# Altium PCB PCB1.PcbDoc (part 2 of 2)
Units mil, origin at the board's own origin, x right, y up, seen from the top; angles counter-clockwise.
Board outline 2130 x 2330 mil, 2 copper layers (Top Layer, Bottom Layer); 110 components, 79 nets, 324 pads, 362 vias.
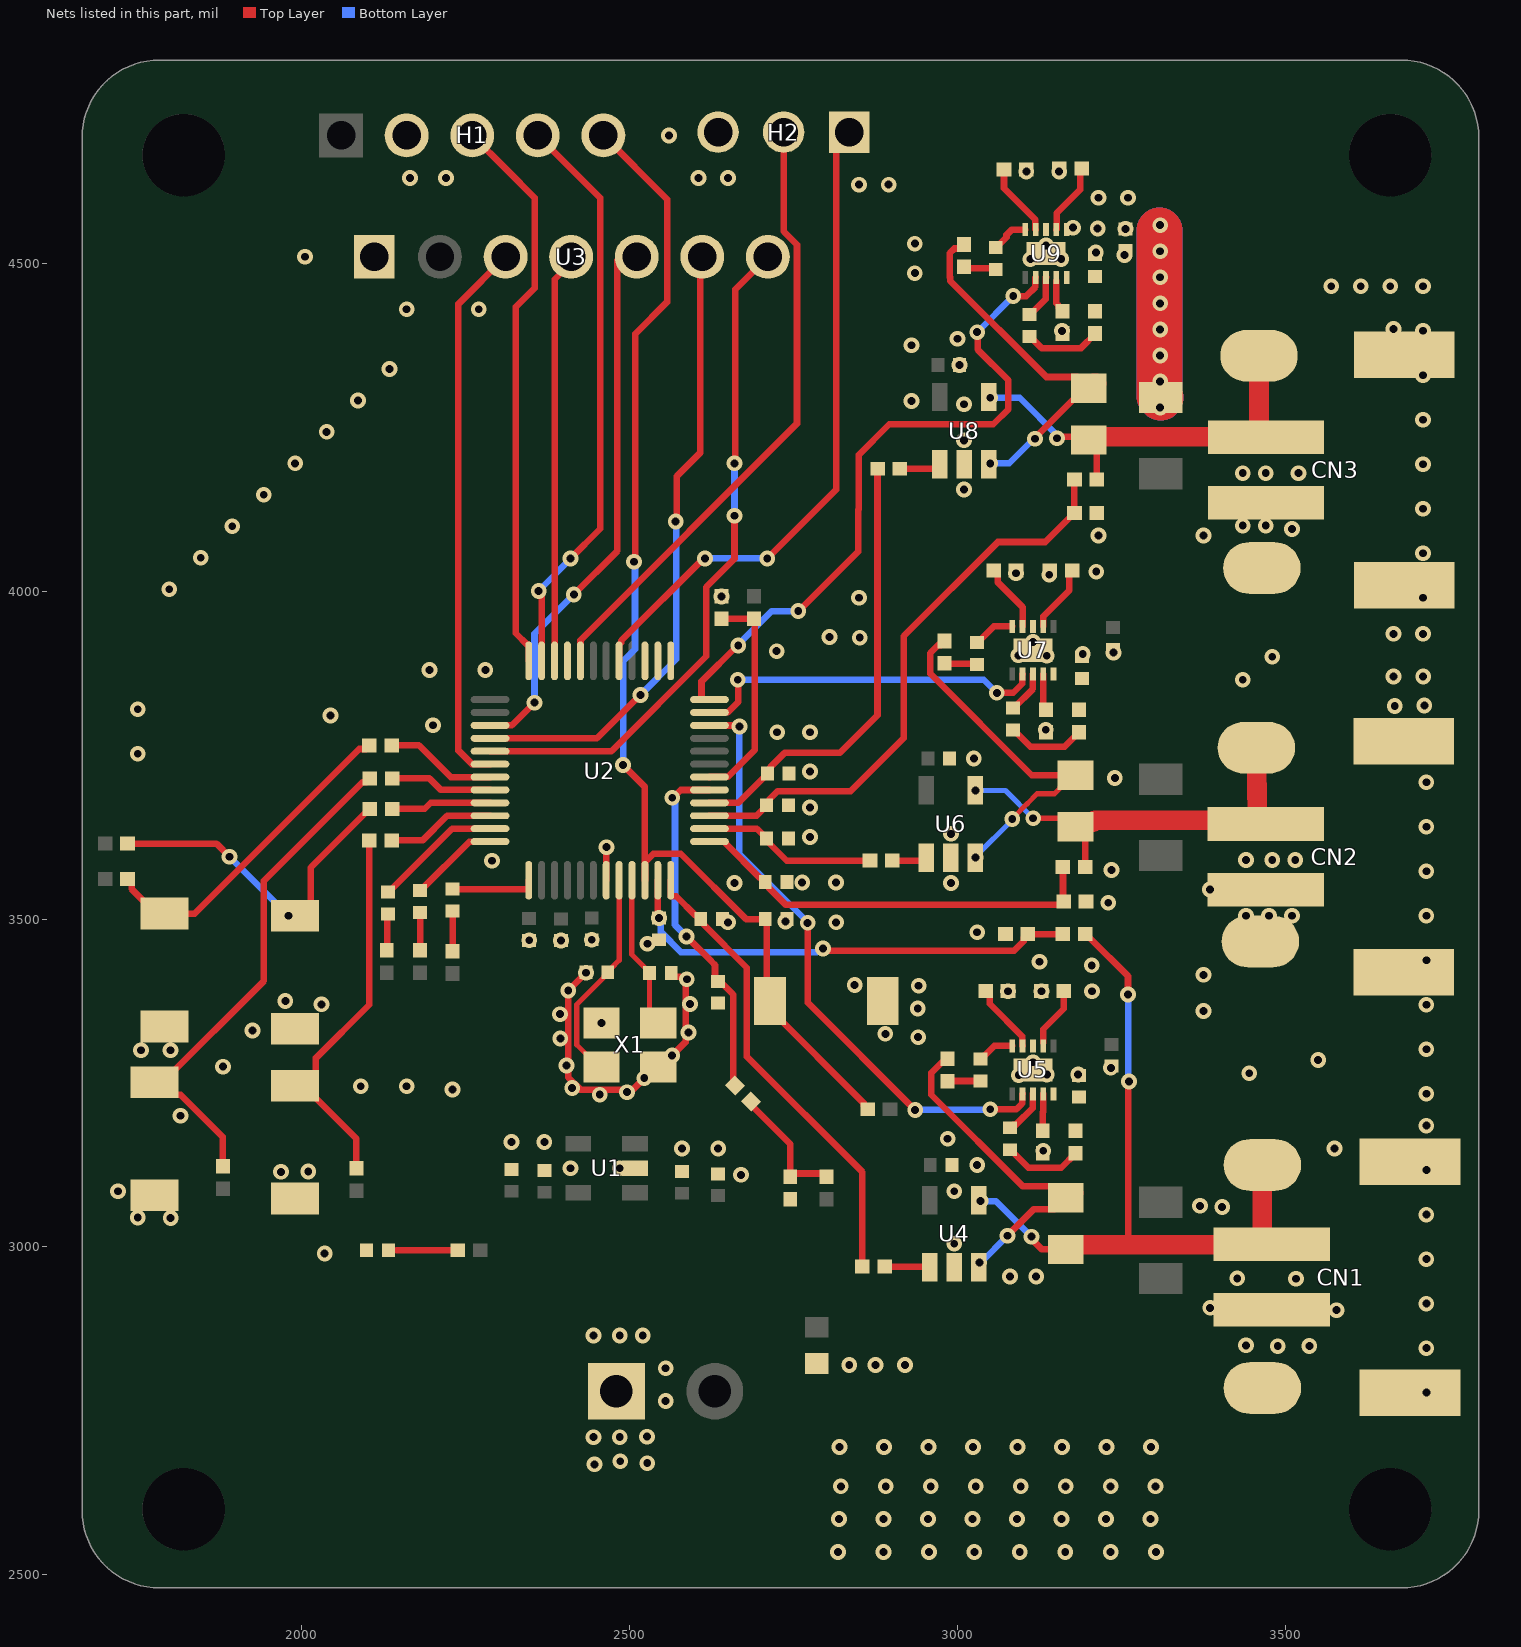
[diagram p2: the nets of this part, all layers, seen from the top]

## Via types
v1: diameter 24, hole 12, Top Layer to Bottom Layer, tented both sides, 362 vias

## Nets (pads, with @x,y where several pads share a name; then routed paths per layer and width w, separated by ;. In a path a pad name is that pad's centre, name@x,y a point inside that pad or via, vN(x,y) a via of type N, cw(c..) or ccw(c..) an arc to the next point about the centre after c; other vN are vias at no path point) (continued)
5V_3: C25.2 R41.1 U9.1 | length 510.5
  Top Layer w70: v1@3308.28,4550.18 3308.28,4513.15 3308.28,4438.95 3308.28,4399.21 3308.28,4359.47 3308.28,4297.34 R41.1@3310,4295.62
  Bottom Layer w70: v1@3308.28,4550.18 3308.28,4513.15 3308.28,4297.34 3310,4295.62
  other v1: 3309.09,4280 3309.09,4319.74 3309.09,4359.47 3309.09,4399.21 3309.09,4438.95 3309.09,4478.69 3309.09,4518.42 3213.76,4553.23 3256.34,4552.54 3176.23,4554.41 3309.09,4558.16 3215,4600 3260,4600
ADC1_IN0: C14.1 R8.2 R13.1 U2.11 | length 723.5
  Top Layer w10: U2.11@2543.08,3559.14 2543.07,3503.47 v1(2545,3501.54) ; v1(2795,3455) 2798.79,3455 2802.03,3451.76 3086.38,3451.76 3101.22,3466.61 3101.22,3471.52 3106.85,3477.15 R8.2@3160.51,3477.15
  Bottom Layer w10: v1(2545,3501.54) 2547.68,3498.86 2547.68,3480.15 2578.39,3449.45 2785.66,3449.45 2791.21,3455 v1(2795,3455)
ADC1_IN1: C15.1 R9.2 U2.12 | length 716.1
  Top Layer w10: U2.12@2562.77,3559.14 2562.77,3535.1 2563.06,3534.81 2571.23,3534.81 2600.41,3505.63 2603.62,3505.63 2608.46,3500.79 C15.1@2608.46,3500 ; C15.1@2608.46,3499.21 2613.3,3494.37 2613.3,3491.29 2678.77,3425.82 2678.77,3290.38 2855,3114.15 R9.2@2855,2970
ADC1_IN2: C21.1 R32.2 R34.1 U2.13 | length 637.8
  Top Layer w10: U2.13@2621.82,3618.19 2645.86,3618.19 2646.15,3617.9 2646.15,3615.56 2699.75,3561.96 2701.98,3561.96 2706.82,3557.12 C21.1@2706.82,3556.33 2711.66,3551.49 2711.66,3548.32 2738.35,3521.63 3156.69,3521.63 R34.1@3161.89,3526.83 ; R34.1@3160.93,3526.83 R32.2@3160.93,3578.69
ADC1_IN3: C22.1 R33.2 U2.14 | length 266.9
  Top Layer w10: U2.14@2621.82,3637.88 2694.09,3637.88 2703.52,3628.45 2704.11,3628.45 2708.95,3623.61 C22.1@2708.95,3623.02 ; C22.1@2708.95,3622.82 2713.79,3617.98 2713.79,3615.03 2739.71,3589.12 R33.2@2866.55,3589.12
ADC1_IN4: C24.1 R40.2 R44.1 U2.15 | length 893.4
  Top Layer w10: U2.15@2621.82,3657.56 2693.67,3657.56 2708.95,3672.84 2708.95,3674.42 2713.79,3679.26 2713.79,3683.1 2725.95,3695.26 2837.37,3695.26 2918.07,3775.96 2918.07,3931.48 3061.59,4075 3133.85,4075 3177.87,4119.02 R44.1@3178.37,4119.02 R40.2@3178.37,4170.41
ADC1_IN5: C27.1 R43.2 U2.16 | length 690.6
  Top Layer w10: U2.16@2621.82,3677.25 2621.94,3677.37 2665.96,3677.37 2710.04,3721.44 2710.04,3723.02 2714.88,3727.86 2714.88,3731.85 2736.42,3753.38 2820.6,3753.38 2878.03,3810.82 R43.2@2878.03,4186.63
ADC1_IN6: C12.2 R4.2 U2.17 | length 542.1
  Top Layer w10: v1(2565,3685) 2565.98,3685 2577.86,3696.88 U2.17@2621.82,3696.93 ; v1(2586.82,3473.54) 2625.2,3435.16 2625.2,3434.84 2630.2,3429.84 2630.2,3409.8 2639.84,3400.16 2642.79,3400.16 2658.03,3384.92 2658.03,3256.79 2660.47,3254.35 2660.47,3246.39 R4.2@2660.83,3246.03
  Bottom Layer w10: v1(2565,3685) 2565,3681.21 2569.25,3676.96 2569.25,3491.11 v1(2586.82,3473.54)
ADC1_IN7: R2.2 R5.2 U2.18 | length 336.7
  Top Layer w10: U2.18@2621.82,3716.62 2621.94,3716.74 2649.54,3716.74 2691.17,3758.37 2691.17,3956.79 R2.2@2690,3957.96 R5.2@2640,3957.96
GND: C1.2 C2.2 C3.1 C4.2 C5.2 C6.2 C7.2 C8.2 C9.2 C10.1 C11.1 C12.1 C13.1 C14.2 C15.2 C16.1 C17.1 C18.1 C19.1 C20.1 C21.2 C22.2 C23.1 C24.2 C25.1 C26.1 C27.2 CN1.2 CN1.3 CN1.4 CN2.2 CN2.3 CN2.4 CN3.2 CN3.3 CN3.4 H1.2 H2.3 LED2.1 P1.1 pad.2@3462,3465.84 pad.2@3464.28,4035.33 pad.2@3465,2785 R5.1 R6.1 R12.2 R13.2 R19.1 R20.1 R31.2 R34.2 R36.1 R37.1 R42.2 R44.2 R46.1 R48.1 SW1.1 SW2.1 SW3.1 SW4.1 SW5.1 U1.2 U2.7 U3.1 U4.2 U5.3 U5.11 U6.2 U7.3 U7.11 U8.2 U9.3 U9.11 X1.2 X1.4 | length 561.3
  Top Layer w10: C5.2@2433.58,3418.96 v1(2433.58,3418.17) v1(2406.49,3391.08) 2406.49,3258.52 2424.93,3240.08 2505.11,3240.08 2539.73,3274.7 X1.4@2543.67,3274.7 2547.6,3274.7 2585.45,3312.54 2585.45,3407.91 2581.66,3407.91 2577.46,3412.1 2568.32,3412.1 2563.48,3416.94 C10.1@2563.48,3417.73 ; U2.7@2464.34,3559.14 2464.34,3609.34 v1(2464.67,3609.67) v1@2465,3610
  other v1: 2817.86,2535 2887.14,2535 2956.43,2535 3025.71,2535 3095,2535 3164.29,2535 3233.57,2535 3302.86,2535 2819.29,2585 2887.14,2585 2955,2585 3022.86,2585 3090.71,2585 3158.57,2585 3226.43,2585 3294.29,2585 2822.14,2635 2890.71,2635 2959.29,2635 3027.86,2635 3096.43,2635 3165,2635 3233.57,2635 3302.14,2635 2446.52,2668.55 2526.89,2670.37 2485.79,2673.28 2820,2695 2887.86,2695 2955.71,2695 3023.57,2695 3091.43,2695 3159.29,2695 3227.14,2695 3295,2695 2445,2710 2485,2710 2526.53,2710.74 2555,2765 3715,2777.86 2555,2815 2835,2820 2875,2820 2920,2820 3715,2845.71 3488.43,2848.78 3536.61,2849.12 3440,2850 2445,2865 2485,2865 2520,2865 3578.06,2903.69 3385.32,2907.12 3715,2913.57 3426.65,2952.17 3516.09,2951.59 3080,2955 3120,2955 3715,2981.43 2035,2990 2995,3005 1800.18,3044.25 1750,3045 3715,3049.29 3403.64,3061.12 3369.68,3062.66 1720,3085 2995,3085 2670,3110 1968.49,3114.59 2010,3115 3715,3117.14 2410,3120 2485,3120 3030,3125 3130.83,3146.63 2580,3150 2635,3150 3575,3150 2320,3160 2370,3160 2985,3165 3715,3185 1815,3200 2454.56,3232.32 3715,3233.57 2496.02,3236.09 2230,3240 2412.37,3242.45 2090,3245 2160,3245 2522.42,3257.39 3093.47,3261.97 3136.31,3262.86 3183.97,3262.95 3445,3265 3233.86,3273.17 1880,3275 2403.68,3276.65 3115.19,3281.75 3550,3285 2564.91,3292.01 1755,3300 1800,3300 3715,3301.43 2394.45,3318.02 2940,3320 2890,3325 2589.68,3327.19 1925,3330 2457.05,3341.63 2393.87,3355 3375,3360 2939.42,3363.65 3715,3369.29 2030,3370 2592.05,3370.63 1975,3375 3077.04,3390 3127.96,3390 3205,3390 2940.82,3398.4 2843.24,3399.46 2587.3,3408.24 3375,3415 3204.71,3429.49 3125,3435 3715,3437.14 2527.37,3462.32 2395.45,3467.22 2346.91,3467.65 2442.28,3468.5 3030,3480 2650,3495 2815,3495 2737.58,3496.3 3440,3505 3475,3505 3510,3505 3715,3505 3230,3525 3385,3545 2660,3555 2990,3555 2763.12,3555.81 2814.63,3555.94 3715,3572.86 3235,3575 2290.28,3588.86 3440,3590 3480,3590 3515,3590 2775,3625 2990,3630 3715,3640.71 2775,3670 3715,3708.57 3240,3715 2775,3725 3025,3745 1750,3752.14 2725,3785 2775,3785 3134.63,3788.73 2200.07,3795.54 2043.73,3810.45 1750,3820 3666.89,3824.99 3711.99,3825.59 3435,3865 3665,3870 3710.16,3870.08 2195,3880 2280,3880 3480,3900 3093.18,3902.2 3136.07,3901.63 3191.07,3904.31 3237.99,3906.26 2724.25,3908.61 3115.12,3922.45 2851.01,3929.19 2805,3930 3665,3935 3710,3935 2850,3990 3710,3990 2640,3992.04 1798.07,4003.07 3140,4025 3089.06,4027.34 3211.66,4029.77 1846.05,4051.05 3710,4057.86 3215,4085 3375,4085 3510,4095 1894.04,4099.04 3435,4100 3470,4100 3710,4125.71 1942.02,4147.02 3010,4155 3435,4180 3470,4180 3520,4180 3710,4193.57 1990,4195 3010,4230 2037.98,4242.98 3710,4261.43 3010,4285 2930,4290 2085.96,4290.96 3710,4329.29 2133.95,4338.95 3003.08,4345 2930,4375 3000,4385 3159.41,4397.06 3710,4397.14 3665,4400 2160,4430 2270,4430 3570,4465 3615,4465 3660,4465 3710,4465 2935,4485 3111.11,4506.4 3158.15,4506.73 2005,4510 3254.86,4512.55 3210.96,4516.66 3135.05,4527.14 2935,4530 2850,4620 2895,4620 2165,4630 2220,4630 2605,4630 2650,4630 3105,4640 3155,4640 2560,4695
NetC5_1: C5.1 U2.8 X1.3 | length 329.3
  Top Layer w8: X1.3@2457.05,3274.7 2453.11,3274.7 2419.49,3308.32 2419.49,3369.94 2460.81,3411.27 2460.81,3413.11 C5.1@2466.66,3418.96 2466.66,3419.74 2472.5,3425.59 2484.31,3437.39 2484.31,3558.86 U2.8@2484.03,3559.14
NetC10_2: C10.2 U2.9 X1.1 | length 234.4
  Top Layer w8: U2.9@2503.71,3559.14 2503.71,3546.1 2503.25,3545.65 2503.25,3446.08 2524.56,3424.77 2524.56,3423.57 C10.2@2530.4,3417.73 ; C10.2@2530.4,3417.73 2530.39,3354.9 X1.1@2543.67,3341.63
NetLED1_1: LED1.1 U5.5 | length 56.7
  Top Layer w10: LED1.1@3035,3286.73 3039.84,3291.57 3041.02,3291.57 3055.97,3306.52 U5.5@3083.5,3306.52
NetLED1_2: LED1.2 R7.1 | length 50.1
  Top Layer w10: R7.1@2985,3252.96 2985.16,3253.12 3034.85,3253.12 LED1.2@3035,3253.27
NetLED2_2: LED2.2 R11.1 | length 80.3
  Top Layer w10: 2145,2995 2225.34,2995
NetLED3_1: LED3.1 U5.8 | length 68.8
  Top Layer w10: LED3.1@3080,3181.73 3084.84,3186.57 3089.28,3186.57 3114.66,3211.95 3114.66,3233.14 U5.8@3115,3233.48
NetLED3_2: LED3.2 R16.1 | length 120.8
  Top Layer w10: LED3.2@3080,3148.27 3080.79,3148.27 3108.23,3120.83 3158.37,3120.83 3180,3142.46 R16.1@3180,3142.96
NetLED4_2: LED4.2 R18.1 | length 61.1
  Top Layer w10: R18.1@2230,3451.07 LED4.2@2230,3512.18
NetLED5_2: LED5.2 R23.1 | length 56.1
  Top Layer w10: R23.1@2129.65,3452.27 2130.67,3453.3 2130.67,3506.52 LED5.2@2131.7,3507.55
NetLED6_2: LED6.2 R25.1 | length 57.8
  Top Layer w10: R25.1@2180.51,3452.27 LED6.2@2180.51,3510.1
NetLED7_1: LED7.1 U7.5 | length 63.8
  Top Layer w10: LED7.1@3030,3921.73 3030.79,3921.73 3055.58,3946.52 U7.5@3083.5,3946.52
NetLED7_2: LED7.2 R28.1 | length 50.7
  Top Layer w10: R28.1@2980,3890 2980.86,3889.14 3029.13,3889.14 LED7.2@3030,3888.27
NetLED8_1: LED8.1 U7.8 | length 64.6
  Top Layer w10: LED8.1@3085,3821.73 3085.79,3821.73 3115,3850.94 U7.8@3115,3873.48
NetLED8_2: LED8.2 R35.1 | length 120
  Top Layer w10: LED8.2@3085,3788.27 3085.79,3788.27 3111.19,3762.86 3163.37,3762.86 3185,3784.49 R35.1@3185,3785
NetLED9_1: LED9.1 U9.5 | length 58.4
  Top Layer w10: LED9.1@3058.4,4524.2 3059.19,4524.2 3074.77,4539.79 3074.77,4543.24 3083.05,4551.52 U9.5@3103.5,4551.52
NetLED9_2: LED9.2 R39.1 | length 52.5
  Top Layer w10: R39.1@3010,4494.62 3008.75,4493.37 3009.44,4492.68 3056.46,4492.68 LED9.2@3058.4,4490.74
NetLED10_1: LED10.1 U9.8 | length 67.6
  Top Layer w10: LED10.1@3110,4421.73 3110.79,4421.73 3134.63,4445.57 3134.63,4452.92 ; 3134.66,4452.95 3134.66,4478.14 U9.8@3135,4478.48
NetLED10_2: LED10.2 R45.1 | length 116.7
  Top Layer w10: LED10.2@3110,4388.27 3110.79,4388.27 3128.23,4370.82 3188.37,4370.82 3210,4392.45 R45.1@3210,4392.96
NetR3_2: R3.2 R4.1 R6.2 | length 194
  Top Layer w10: R4.1@2684.93,3221.93 2684.93,3216.96 2745.17,3156.72 R6.2@2745.17,3112.04 ; R6.2@2745,3107.04 2750,3112.04 2795,3112.04 R3.2@2800,3107.04
NetR9_1: R9.1 U4.1 | length 69
  Top Layer w10: R9.1@2889.08,2970 2956.41,2970 U4.1@2957.6,2968.81
NetR12_1: R12.1 U5.9 | length 56.8
  Top Layer w10: R12.1@3130,3177.04 3130,3205.65 3130.75,3206.4 U5.9@3130.75,3233.48
NetR14_1: R14.1 R15.2 SW2.2 | length 504.7
  Top Layer w10: R15.2@1734.37,3615.14 1869.86,3615.14 v1(1890,3595) ; SW2.2@1990,3504.98 1994.69,3504.98 2013.9,3524.19 2013.9,3578.57 2103.51,3668.18 R14.1@2104.02,3668.18
  Bottom Layer w10: v1(1890,3595) v1(1980,3505)
NetR19_2: R19.2 U5.4 | length 107.1
  Top Layer w10: R19.2@3042.96,3390 3043.47,3390 3049.09,3384.37 3049.09,3370.83 3098.91,3321.02 3098.91,3306.86 U5.4@3099.25,3306.52
NetR20_2: R20.2 U5.2 | length 91.5
  Top Layer w10: U5.2@3130.7,3311.46 3130.7,3332.05 3162.04,3363.39 R20.2@3162.04,3390
NetR21_1: R21.1 R22.2 SW3.2 | length 781.3
  Top Layer w10: R22.2@1879.63,3122.96 1879.63,3167.89 1815.66,3231.86 1800.78,3231.86 1781.57,3251.08 1787.77,3251.08 1942.39,3405.69 1942.39,3558.32 2092.93,3708.87 2098.39,3708.87 R21.1@2104.02,3714.5
NetR24_1: R24.1 R26.2 SW4.2 | length 502.1
  Top Layer w10: R26.2@1734.37,3561 1734.87,3561 1740.5,3555.37 1740.5,3546.07 1778.17,3508.41 SW4.2@1790.57,3508.41 1836.92,3508.41 2087.88,3759.37 2097.33,3759.37 R24.1@2102.96,3765
NetR27_1: R27.1 R29.2 SW5.2 | length 575.4
  Top Layer w10: R29.2@2083.42,3119.81 2083.42,3165 2002.4,3246.02 2021.61,3265.23 2021.61,3288.17 2102.96,3369.51 R27.1@2102.96,3620
NetR31_1: R31.1 U7.9 | length 56.2
  Top Layer w10: U7.9@3130.75,3873.48 3131.09,3873.14 3131.09,3822.99 R31.1@3135,3819.08
NetR33_1: R33.1 U6.1 | length 53.9
  Top Layer w10: R33.1@2900.63,3589.12 2947.9,3589.12 U6.1@2952.6,3593.81
NetR36_2: R36.2 U7.4 | length 103.2
  Top Layer w10: R36.2@3055.19,4031.28 3055.47,4031.28 3061.1,4025.65 3061.1,4013.9 3099.25,3975.75 U7.4@3099.25,3946.52
NetR37_2: R37.2 U7.2 | length 103
  Top Layer w10: U7.2@3130.75,3946.52 3131.09,3946.86 3131.09,3961.88 3170.73,4001.52 3170.73,4027.13 R37.2@3174.88,4031.28
NetR42_1: R42.1 U9.9 | length 50.4
  Top Layer w10: U9.9@3150.6,4473.54 3150.6,4439.27 3154.37,4435.5 3154.37,4432.67 R42.1@3160,4427.04
NetR43_1: R43.1 U8.1 | length 63.4
  Top Layer w10: R43.1@2912.24,4186.76 2965.79,4186.76 2972.6,4193.57 U8.1@2972.6,4193.81
NetR46_2: R46.2 U9.4 | length 111.8
  Top Layer w10: R46.2@3070.92,4643.23 3070.92,4614.37 3118.91,4566.38 3118.91,4551.86 U9.4@3119.25,4551.52
NetR48_2: R48.2 U9.2 | length 109
  Top Layer w10: U9.2@3150.75,4551.52 3151.09,4551.86 3151.09,4576.38 3187.1,4612.39 3187.1,4642.02 R48.2@3189.54,4644.45
NRST: C11.2 H1.5 R1.1 SW1.2 U2.10 | length 1829.4
  Top Layer w10: H1.5@2460,4695 2557.23,4597.77 2557.23,4440.82 2508.65,4392.24 v1@2508.65,4046.05 ; v1(2490,3735) 2523.4,3701.6 U2.10@2523.4,3559.14 2523.52,3559.26 2523.52,3586.87 2536.32,3599.67 2577.9,3599.67 2677.57,3500 C11.2@2706.82,3500 2708.9,3497.92 2708.9,3380.08 SW1.2@2713.98,3375 2713.98,3362.6 2856.82,3219.75 2856.82,3215.63 2862.45,3210 R1.1@2862.96,3210
  Bottom Layer w10: v1(2490,3735) 2490,3893.11 2508.27,3911.37 2508.27,4043.91 v1@2507.35,4044.82
  other v1: 2506.73,4044.82
PB4: R24.2 U2.43 | length 170.2
  Top Layer w10: R24.2@2137.04,3765 2178.79,3765 2227.17,3716.62 U2.43@2287.18,3716.62
PB5: R21.2 U2.44 | length 156.4
  Top Layer w10: R21.2@2138.1,3714.5 2194.67,3714.5 2212.24,3696.93 U2.44@2287.18,3696.93
PB6: R14.2 U2.45 | length 152.8
  Top Layer w10: R14.2@2138.1,3668.18 2187.77,3668.18 2196.84,3677.25 U2.45@2287.18,3677.25
PB7: R27.2 U2.46 | length 165.7
  Top Layer w10: R27.2@2137.04,3620 2184.2,3620 2221.76,3657.56 U2.46@2287.18,3657.56
PB8: LED5.1 U2.47 | length 195.6
  Top Layer w10: LED5.1@2131.7,3541.01 2132.49,3541.01 2229.35,3637.88 U2.47@2287.18,3637.88
PB9: LED6.1 U2.48 | length 137.6
  Top Layer w10: LED6.1@2180.51,3543.56 2181.3,3543.56 2255.8,3618.07 2287.06,3618.07 U2.48@2287.18,3618.19
PB10: U2.22 U5.7 | length 914
  Top Layer w10: U2.22@2621.82,3795.36 2621.94,3795.24 2665.77,3795.24 v1(2667.48,3793.54) ; v1@2771.99,3493.74 2771.99,3372.47 v1(2935.42,3209.04) ; v1(3050,3210) 3089.93,3210 3098.91,3218.98 3098.91,3233.14 U5.7@3099.25,3233.48
  Bottom Layer w10: v1@2667.17,3785.83 2667.17,3599.44 v1@2770.78,3495.82 ; v1(2935.42,3209.04) 2935.9,3209.52 3049.52,3209.52 v1(3050,3210)
  other v1: 2771.49,3494.22
PB11: U2.23 U7.7 | length 547.4
  Top Layer w10: U2.23@2621.82,3815.04 2621.94,3815.16 2649.53,3815.16 2665.96,3831.59 2665.96,3864.04 v1(2665,3865) ; v1(3060,3845) 3084.93,3845 3098.91,3858.98 3098.91,3873.14 U7.7@3099.25,3873.48
  Bottom Layer w10: v1(2665,3865) 3040,3865 v1(3060,3845)
PB12: U2.24 U9.7 | length 1034.4
  Top Layer w10: U2.24@2621.82,3834.73 2609.94,3834.73 2609.65,3835.02 2609.65,3862.39 v1@2664.76,3917.5 ; v1@2757.93,3969.72 2848.63,4060.42 2848.63,4124.31 2849.32,4125 2849.32,4207.68 2896.1,4254.45 3054.69,4254.45 3077.75,4277.52 3077.75,4321.61 3030.73,4368.63 3030.73,4394.27 v1(3030,4395) ; v1(3085,4450) 3104.93,4450 3118.91,4463.98 3118.91,4478.14 U9.7@3119.25,4478.48
  Bottom Layer w10: v1@2664.51,3917.5 2716.72,3969.72 v1(2757.12,3969.72) ; v1(3030,4395) v1(3085,4450)
  other v1: 2665.79,3917.25
PB13: U2.25
PB14: U2.26
PB15: U2.27
PC13: LED4.1 U2.1 | length 129.6
  Top Layer w10: LED4.1@2230,3545.65 2345.94,3545.65 2346.23,3545.94 U2.1@2346.23,3559.14
PD1: U2.39 U3.5 | length 808.9
  Top Layer w10: U2.39@2287.18,3795.36 2287.3,3795.48 2320.48,3795.48 v1(2355,3830) ; v1(2415,3995) 2481.4,4061.4 U3.5@2481.4,4504.38
  Bottom Layer w10: v1(2355,3830) 2355,3935 v1(2415,3995)
PD2: U2.40 U3.6 | length 966.2
  Top Layer w10: U2.40@2287.18,3775.67 2450.16,3775.67 v1@2517.26,3842.77 ; v1(2570.19,4106.37) 2572.12,4108.3 2572.12,4175.61 2608.03,4211.52 2608.03,4507.13 U3.6@2610.85,4509.95
  Bottom Layer w10: v1(2516.48,3841.73) 2571.11,3896.36 2571.11,4106.41 v1@2570.67,4106.85
PD3: U2.41 U3.7 | length 1037.9
  Top Layer w10: U2.41@2287.18,3755.99 2472.26,3755.99 2617,3900.73 2617,4006.36 2660,4049.36 v1(2660,4115) ; v1(2660,4195) 2660.99,4195.99 2660.99,4460.1 U3.7@2710.85,4509.95
  Bottom Layer w10: v1(2660,4115) v1(2660,4195)
SPI1_MISO: U2.33
SPI1_MOSI: U2.34 U3.4 | length 626.3
  Top Layer w10: U2.34@2385.89,3894.13 2385.72,3894.3 2385.72,3918.28 2385.94,3918.51 2385.94,4475.63 2410.85,4500.54 U3.4@2410.85,4509.95
SPI1_SCK: U2.42 U3.3 | length 839.6
  Top Layer w10: U2.42@2287.18,3736.3 2287.06,3736.42 2259.46,3736.42 2238.9,3756.98 2238.9,4438 U3.3@2310.85,4509.95
SWCLK: H1.3 U2.36 | length 861.9
  Top Layer w10: H1.3@2260,4695 2312.83,4642.17 2355.31,4599.69 2355.31,4462.41 2326.43,4433.53 2326.43,3935.79 2344.11,3918.11 2345.94,3918.11 2346.23,3917.82 U2.36@2346.23,3893.78
SWDIO: H1.4 U2.35 | length 881.5
  Top Layer w10: H1.4@2360,4695 2455.31,4599.69 2455.31,4095.31 v1(2410,4050) ; v1(2361.35,4000.16) 2361.35,3996.37 2365.92,3991.81 U2.35@2365.92,3893.78
  Bottom Layer w10: v1(2361.35,4000.16) 2361.35,4000.76 2410,4049.4 v1(2410,4050)
USART1_RX: H2.2 U2.32 | length 951.5
  Top Layer w10: U2.32@2424.97,3893.78 2425.09,3893.9 2425.09,3925.3 2755.32,4255.53 2755.32,4528.37 2735,4548.68 H2.2@2735,4700
USART1_TX: H2.1 U2.29 | length 1008.6
  Top Layer w10: U2.29@2484.03,3893.78 2484.03,3918.16 2487.39,3921.53 2487.39,3924.75 2612.64,4050 v1(2615,4050) ; v1(2710,4050) 2814.86,4154.86 2814.86,4679.86 H2.1@2835,4700
  Bottom Layer w10: v1(2615,4050) v1(2710,4050)
VBAT1: CN1.1 pad.2@3465,3125 R8.1 R17.2 U4.4 | length 1098
  Top Layer w10: v1(3112.74,3015.68) 3112.74,3012.26 3128.74,2996.26 R17.2@3165,2996.26 ; R8.1@3194.59,3477.15 3200.22,3471.52 3201.52,3471.52 3260,3413.04 v1(3260,3385) ; 3259.84,3003.17 3260.53,3003.86 v1@3260.53,3251.95
  Top Layer w30: R17.2@3165,2996.26 3171.92,3003.17 3259.84,3003.17 CN1.1@3467.04,3003.17 ; pad.2@3465,3125 3465,3014.58 3475.59,3003.99 CN1.1@3479.37,3003.99
  Bottom Layer w10: v1(3035,3070) 3058.42,3070 v1(3112.74,3015.68) ; v1@3260.23,3384.77 3260.23,3253.73 v1@3261.12,3252.84
  other v1: 3261.72,3252.25
VBAT1_H: C17.2 R7.2 R16.2 R17.1 U4.3 U5.10 | length 525.1
  Top Layer w10: R7.2@2985,3287.04 2985,3286.54 2979.37,3280.91 2975.62,3280.91 2960,3265.28 2960,3232.24 3099.95,3092.29 3147.71,3092.29 R17.1@3165,3075 3147.7,3057.7 3116.56,3057.7 v1@3076.39,3017.53
  Top Layer w30: R17.1@3165,3075 3172.29,3082.29 R17.1@3177.11,3082.29
  Bottom Layer w10: v1(3033.32,2976.07) 3035.35,2976.07 v1(3076.39,3017.1)
VBAT2: CN2.1 pad.2@3455.86,3761.23 R32.1 R38.2 U6.4 | length 686.8
  Top Layer w8: v1(3115.39,3653.84) 3115.59,3653.63 3162.18,3653.63 3175.19,3640.63 R38.2@3180,3640.63
  Top Layer w10: R38.2@3180,3640.63 3194.59,3626.04 R32.1@3194.59,3579.11 ; 3267.86,3640.78 3291.77,3640.78
  Top Layer w30: R38.2@3180,3640.63 3187.3,3647.92 3206.68,3647.92 3209.68,3650.93 3464.07,3650.93 CN2.1@3470,3645 3467.59,3645 3457,3655.59 pad.2@3455.86,3761.23
  Bottom Layer w8: v1(3027.4,3696.19) 3073.04,3696.19 v1(3115.39,3653.84)
VBAT2_H: C20.2 R28.2 R35.2 R38.1 U6.3 U7.10 | length 553.4
  Top Layer w8: v1@3083.46,3653.03 3106.27,3675.84 ; 3106.31,3675.84 3121.52,3691.06 3147.69,3691.06 3156.89,3700.26 3156.89,3701.08 3175.19,3719.37 R38.1@3180,3719.37
  Top Layer w10: R28.2@2980,3924.08 2980,3923.57 2974.37,3917.95 2970.62,3917.95 2958.37,3905.69 2958.37,3874.31 3113.31,3719.37 R38.1@3180,3719.37
  Bottom Layer w8: v1(3027.4,3593.81) 3027.4,3595.23 3083.46,3651.29 v1(3083.46,3652.7)
VBAT3: CN3.1 pad.2@3459.81,4359.02 R40.1 R47.2 U8.4 | length 641.1
  Top Layer w10: v1(3151.73,4233.19) 3153.85,4235.32 3184.69,4235.32 3190,4240.63 R47.2@3200,4230.63 3212.45,4218.18 R40.1@3212.45,4170.41
  Top Layer w30: R47.2@3200,4230.63 3204.95,4235.58 CN3.1@3457.74,4235.58 ; pad.2@3459.81,4359.02 3459.81,4245.44 3470.4,4234.85 CN3.1@3470.63,4234.85
  Bottom Layer w10: v1(3050,4295) 3094.86,4295 3154.53,4235.33 v1@3154.53,4232.96
VBAT3_H: C26.2 R39.2 R45.2 R47.1 U8.3 U9.10 | length 562.4
  Top Layer w10: R39.2@3010,4528.7 3010,4528.2 3004.37,4522.57 2995.25,4522.57 2988.37,4515.69 2988.37,4478.93 2988.66,4478.65 2988.66,4473.58 3135.58,4326.66 3182.71,4326.66 3196.74,4312.63 R47.1@3200,4309.37 3182.7,4292.08 3176.19,4292.08 3118.27,4234.16 v1(3118.27,4232.51)
  Top Layer w30: R47.1@3200,4309.37 3207.29,4316.66 R47.1@3212.11,4316.66
  Bottom Layer w10: v1(3050,4195) 3078.8,4195 3116.32,4232.51 v1(3118.27,4232.51)
pads on no net: *1.1 *2.1 *3.1 *4.1 U1.4 U2.2 U2.3 U2.19 U2.20 U2.21 U2.28 U2.30 U2.31 U2.37 U2.38 U5.6 U7.6 U9.6

## Polygon pours and split planes (outlines as drawn)
VBAT1_H on Top Layer "NONET_L-01_P-001" (hatched Horizontal grid 4 track 5, remove dead copper, pour order 15): 3138.74,3244.96 3138.74,3185.34 3165.96,3158.12 3196.29,3158.12 3196.29,3129.52 3176.64,3109.88 3128.74,3109.88 3128.74,3077.49 3127.37,3076.11 3130.81,3072.66 3244.53,3072.66 3244.53,3245.3 3243.15,3246.68
VBAT3_H on Top Layer "NONET_L-01_P-001" (hatched Horizontal grid 4 track 5, remove dead copper, pour order 14): 3157.18,4490.63 3157.18,4448.16 3161.56,4443.78 3176.55,4443.78 3176.55,4423.17 3190.92,4408.8 3224.65,4408.8 3224.65,4372.88 3210.59,4358.83 3164.99,4358.83 3164.99,4311.98 3167.8,4309.17 3168.12,4309.48 3262.44,4309.48 3262.44,4487.44 3265,4490
VBAT2_H on Top Layer "NONET_L-01_P-001" (hatched Horizontal grid 4 track 5, remove dead copper, pour order 13): 3137.26,3884.49 3138.9,3882.85 3138.9,3838.49 3143.33,3838.49 3154.31,3827.52 3154.07,3827.28 3154.07,3800.2 3198.2,3800.2 3200.07,3798.33 3200.07,3767.04 3182.32,3767.04 3164.35,3749.06 3144.27,3749.06 3144.27,3725.72 3144.5,3725.48 3144.73,3725.72 3223.89,3725.72 3262.65,3764.47 3262.65,3884.96
GND on Top Layer "NONET_L-01_P-001" (solid, remove dead copper, pour order 16): 1665,2598.11 1665,4691.89 cw(c1783.11,4691.89) 1783.11,4810 3676.89,4810 cw(c3676.89,4691.89) 3795,4691.89 3795,2598.11 cw(c3676.89,2598.11) 3676.89,2480 1783.11,2480 cw(c1783.11,2598.11)
5V_1 on Top Layer "NONET_L-01_P-001" (hatched Horizontal grid 4 track 5, remove dead copper, pour order 9): 3170,3355 3139.76,3324.76 3139.76,3296.15 3338.85,3296.15 3340,3295 3340,3355
5V_2 on Top Layer "NONET_L-01_P-001" (hatched Horizontal grid 4 track 5, remove dead copper, pour order 8): 3138.03,3939.64 3139.13,3940.74 3139.13,3974.18 3143.65,3974.18 3179.47,4010 3330,4010 3330,3945.48 3319.31,3934.78 3142.43,3934.78
5V_3 on Top Layer "NONET_L-01_P-001" (hatched Horizontal grid 4 track 5, remove dead copper, pour order 7): 3160,4540 3335,4540 3335,4610 3193.61,4610 3158.39,4574.77 3158.39,4564.37
3V3 on Top Layer "NONET_L-01_P-001" (hatched Horizontal grid 4 track 5, remove dead copper, pour order 0): 2395,3595 2395,3525 2330,3525 2320,3515 2320,3480 2455,3480 2455,3485 2455,3490 2455,3595
5V_1 on Bottom Layer "NONET_L-01_P-001" (hatched Horizontal grid 4 track 5, remove dead copper, pour order 3): 3170,3355 3139.76,3324.76 3139.76,3296.15 3248.78,3296.15 3248.78,3355
5V_2 on Bottom Layer "NONET_L-01_P-001" (hatched Horizontal grid 4 track 5, remove dead copper, pour order 5): 3138.03,3939.64 3139.13,3940.74 3139.13,3974.18 3143.65,3974.18 3179.47,4010 3330,4010 3330,3945.48 3319.31,3934.78 3142.43,3934.78
5V_3 on Bottom Layer "NONET_L-01_P-001" (hatched Horizontal grid 4 track 5, remove dead copper, pour order 2): 3165.99,4540 3335,4540 3335,4610 3200,4610 3163.76,4573.76
GND on Bottom Layer "NONET_L-01_P-001" (solid, remove dead copper, pour order 6): 1665,2598.11 1665,4691.89 cw(c1783.11,4691.89) 1783.11,4810 3676.89,4810 cw(c3676.89,4691.89) 3795,4691.89 3795,2598.11 cw(c3676.89,2598.11) 3676.89,2480 1783.11,2480 cw(c1783.11,2598.11)

## Other copper
Top Layer:
  pour cut-out: 2474.11,3441.62 2470.73,3445 2395,3445 2395,3225 2595,3225 2595,3430 2585,3440

## Silkscreen, mask and mechanical layers (free items; w line width, h text height)
Top Overlay:
  lines w10: 2050,4330 2080,4300 ; 2080,4380 2080,4300 ; 2110,4330 2080,4300
  text "GND" at 2581.97,4762.64 h30
  text "RX" at 2688.41,4762.64 h30
  text "TX" at 2797.28,4762.64 h30
  text "3V3" at 2015,4757.42 h30
  text "GND" at 2114.05,4757.42 h30
  text "CLK" at 2204.05,4757.42 h30
  text "DIO" at 2299.76,4757.42 h30
  text "RST" at 2404.05,4757.42 h30
  text "OLED" at 2025,4395 h30
  text "+" at 3458.55,4280.17 h30
  text "-" at 3445,3965 h30
  text "+" at 3440,3815 h30
  text "-" at 3445,3395 h30
  text "RST" at 2743.55,3265.17 h30
  text "+" at 3447.26,3180.02 h30
  text "GND" at 2453.87,2869.58 h30
  text "5V" at 2623.87,2869.58 h30
  text "Triple 1S Battery Charger / Ver 1.0 / 2026/10/12" at 1755,2760 h30
  text "-" at 3440.82,2714.9 h30
Top Solder:
  lines w30: 2745.36,2582.04 2893.32,2730 3060,2730 3060,2725 2920,2585 3110,2585 3255,2730 ; 2835,2580 2940,2685 2940,2690 ; 3060,2620 3165,2725 ; 3185,2585 3295,2695 ; 3260,2730 3255,2730 ; 3270,2580 3415,2725 3415,2730 3255,2730 ; 3295,2695 3295,2695
  lines w70: 2630,2780 2745,2895 3275,2895 3305,2925 ; 3308.28,4550.18 3308.28,4513.15 3308.28,4297.34 3310,4295.62 ; 3310,3068.22 3315.63,3073.85 3315.63,3259.73 3315.63,3270 3315.63,3285.68 3315.63,3302.05 3315.63,3304.54 3315.63,3591.15 3310,3596.78 ; 3310,3713.22 3305.56,3717.66 3305.56,3902.61 3305.56,3949.96 3305.56,3981.88 3305.56,4174.75 3310,4179.18
Mechanical 1:
  the board outline again, w10